# EAGLE board tpms_board (EAGLE 9.6.2)
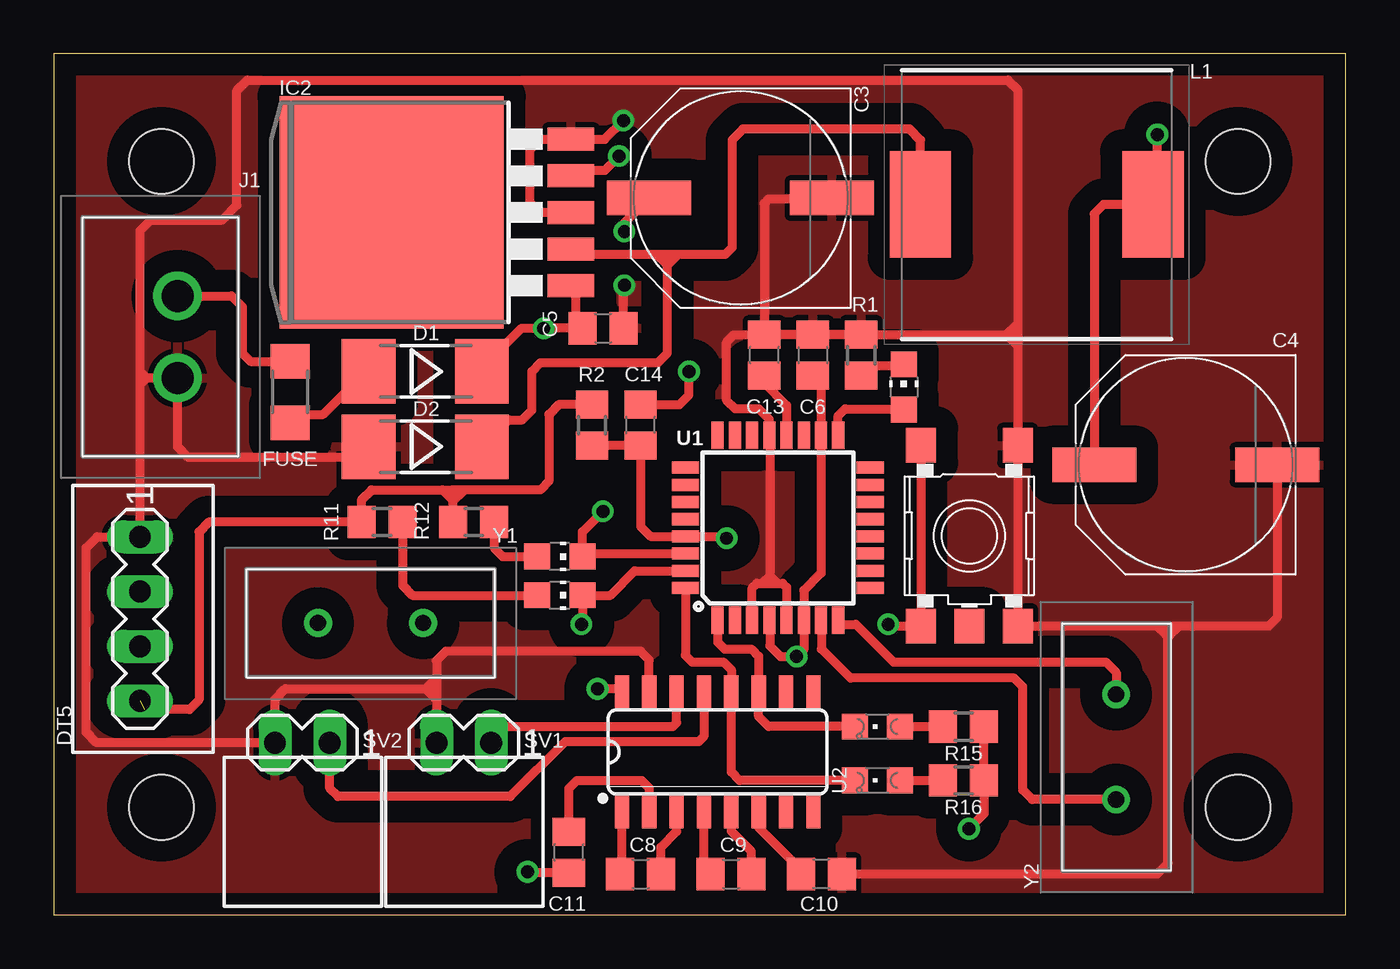
[diagram p0: board, top side]
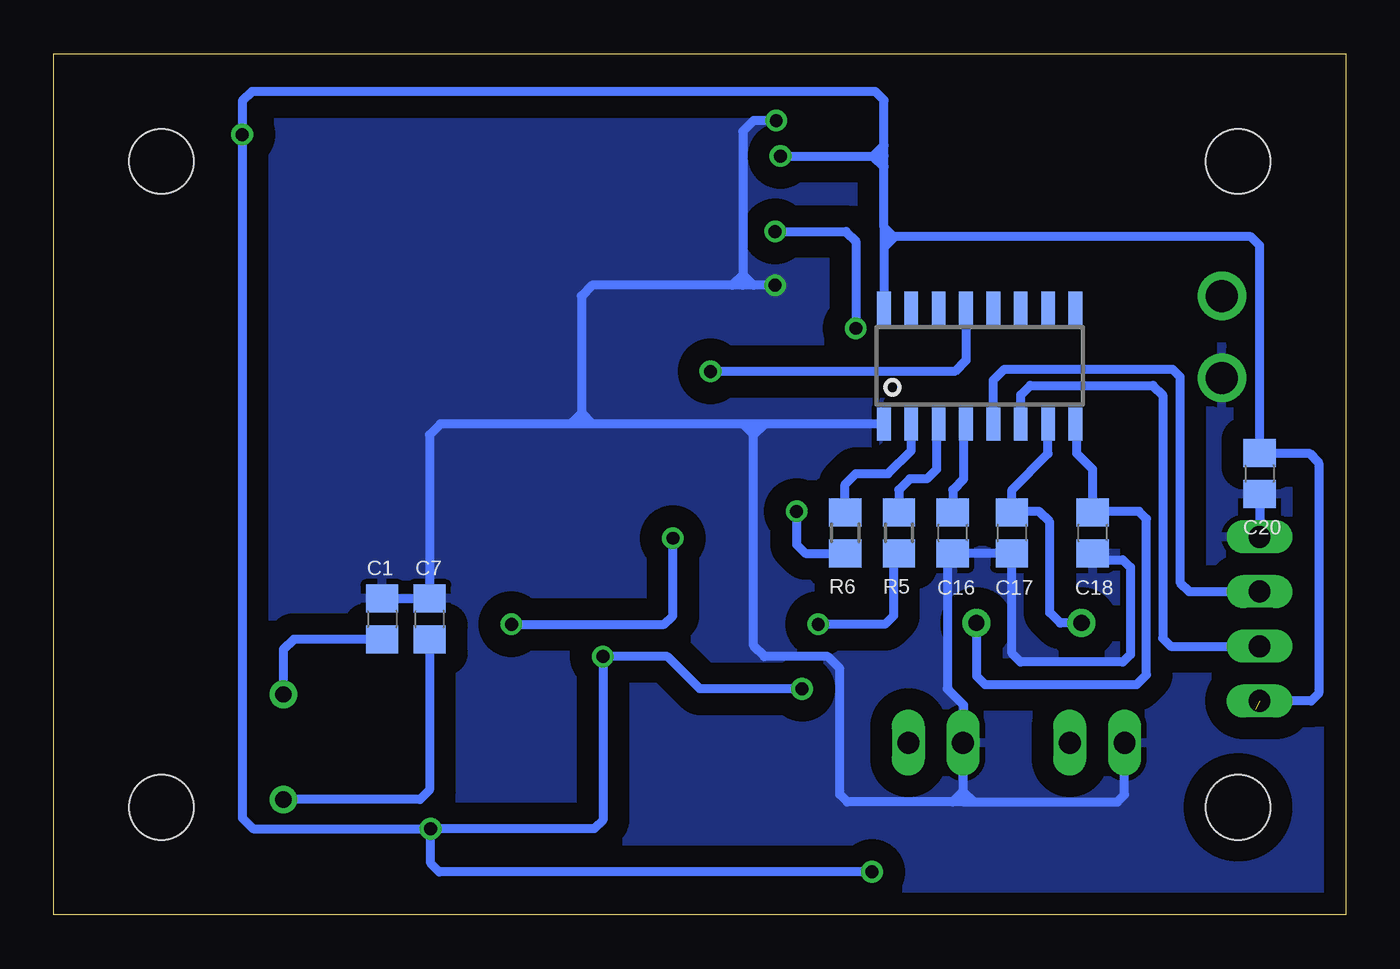
[diagram p1: board, bottom side, seen from below]

Size 60 x 40 mm. Coordinates in mm from the lower left corner, seen from the top.
Outline: 0,0 60,0 60,40 0,40 0,0
Copper layers (1*16): Top 0.035mm / dielectric 1.5mm / Bottom 0.035mm
Design rules "default *": minimum track width 6mil, minimum drill 0.35mm, track to track 40mil, track to pad 40mil, pad to pad 40mil, via to via 40mil, smd to smd 6mil, copper to edge 40mil, drill to drill 6mil, minimum pad ring 10mil, minimum via ring 8mil, stop-mask expansion 4mil, vias tented up to drill 0mil, thermal gap 10mil
Holes 3 mm at 5,35 5,5 55,35 55,5

## Footprints (pad centres in the part's own frame; a part is rotated, then mirrored left to right if it is on the bottom)
C0805 = smd 1.3 x 1.5: 1 -0.95,0; 2 0.95,0
PANASONIC_G = smd 3.9 x 1.6: + 4.25,0; - -4.25,0
MELF-MLL41 = smd 2.5 x 3: A 2.625,0; C -2.625,0
MA04-1 = drill 1.016 long: 1 -3.81,0; 2 -1.27,0; 3 1.27,0; 4 3.81,0
R1206 = smd 1.6 x 1.803: 1 -1.422,0; 2 1.422,0
TO263-5 = smd 1.067 x 2.159: 1 -3.404,-5.791; 2 -1.702,-5.791; 3 0,-5.791; 4 1.702,-5.791; 5 3.404,-5.791 | smd 10.8 x 10.41: 6 0,2.54
691305330002 = drill 1.5 pad 2.25: 1 0,0; 2 3.81,0
INDPM125125X800N = smd 2.85 x 4.95: 1 -5.4,0; 2 5.4,0
CHIPLED_0805 = smd 1.2 x 1.2: A 0,-1.05; C 0,1.05
CHIP-LED0805 = smd 1.2 x 1.2: A 0,-1.05; C 0,1.05
R0805 = smd 1.3 x 1.5: 1 -0.95,0; 2 0.95,0
SKHMPXE010 = smd 1.6 x 1.4: 1 -4.2,2.25; 2 4.2,2.25; 3 -4.2,-2.25; 4 4.2,-2.25; 5 4.2,0
MA04-1' = drill 1.016 long: 1 -3.81,0; 2 -1.27,0
TQFP32-08 = smd 1.27 x 0.559: 1 -4.293,2.8; 2 -4.293,2; 3 -4.293,1.2; 4 -4.293,0.4; 5 -4.293,-0.4; 6 -4.293,-1.2; 7 -4.293,-2; 8 -4.293,-2.8; 17 4.293,-2.8; 18 4.293,-2; 19 4.293,-1.2; 20 4.293,-0.4; 21 4.293,0.4; 22 4.293,1.2; 23 4.293,2; 24 4.293,2.8 | smd 0.559 x 1.27: 9 -2.8,-4.293; 10 -2,-4.293; 11 -1.2,-4.293; 12 -0.4,-4.293; 13 0.4,-4.293; 14 1.2,-4.293; 15 2,-4.293; 16 2.8,-4.293; 25 2.8,4.293; 26 2,4.293; 27 1.2,4.293; 28 0.4,4.293; 29 -0.4,4.293; 30 -1.2,4.293; 31 -2,4.293; 32 -2.8,4.293
SOIC16-1.27-10X3.9MM = smd 0.66 x 1.524: 1 -4.445,-2.794; 2 -3.175,-2.794; 3 -1.905,-2.794; 4 -0.635,-2.794; 5 0.635,-2.794; 6 1.905,-2.794; 7 3.175,-2.794; 8 4.445,-2.794; 9 4.445,2.794; 10 3.175,2.794; 11 1.905,2.794; 12 0.635,2.794; 13 -0.635,2.794; 14 -1.905,2.794; 15 -3.175,2.794; 16 -4.445,2.794
SOIC16 = smd 0.635 x 1.524: 1 -4.445,-2.695; 2 -3.175,-2.695; 3 -1.905,-2.695; 4 -0.635,-2.695; 5 0.635,-2.695; 6 1.905,-2.695; 7 3.175,-2.695; 8 4.445,-2.695; 9 4.445,2.695; 10 3.175,2.695; 11 1.905,2.695; 12 0.635,2.695; 13 -0.635,2.695; 14 -1.905,2.695; 15 -3.175,2.695; 16 -4.445,2.695
9B12000MEEJB = drill 0.755 pad 1.294: 1 0,0; 2 4.88,0

## Placement (x,y rotation side)
C1  22pF  [C0805]  44.75,13.75 270 bottom
C3  100/50v  [PANASONIC_G]  31.9,33.3 180 top
C4  220UF/35V  [PANASONIC_G]  52.57,20.91 180 top
C5  100N  [C0805]  25.5,27.25 0 top
C6  100n  [C0805]  35.25,26 270 top
C7  22pF  [C0805]  42.55,13.75 270 bottom
C8  10UF  [C0805]  27.25,1.9 0 top
C9  10UF  [C0805]  31.45,1.9 0 top
C10  10UF  [C0805]  35.65,1.9 180 top
C11  10UF  [C0805]  23.92,2.9 90 top
C13  100nF  [C0805]  33,26 90 top
C14  100nF  [C0805]  27.25,22.75 90 top
C16  100n  [C0805]  18.25,17.75 90 bottom
C17  22pF  [C0805]  15.5,17.75 90 bottom
C18  22pF  [C0805]  11.75,17.75 90 bottom
C20  1uF  [C0805]  4,20.5 270 bottom
D1  1N5822  [MELF-MLL41]  17.25,25.25 180 top
D2  1N5822  [MELF-MLL41]  17.25,21.75 180 top
DT5  [MA04-1]  4,13.75 270 top
FUSE  2A / 32V  [R1206]  10.98,24.29 270 top
IC2  LM2596S  [TO263-5]  18.23,32.63 90 top
J1  INPUT  [691305330002]  5.75,28.75 270 top
L1  DR127-471-R  [INDPM125125X800N]  45.65,33 0 top
LED10  [CHIPLED_0805]  38.25,6.25 90 top
LED11  [CHIPLED_0805]  38.25,8.75 90 top
ON  [CHIP-LED0805]  39.48,24.53 0 top
R1  330  [R0805]  37.5,26 270 top
R2  10K  [R0805]  25,22.75 90 top
R5  470  [R0805]  20.75,17.75 90 bottom
R6  470  [R0805]  23.25,17.75 90 bottom
R11  1K  [R0805]  15.25,18.25 0 top
R12  1K  [R0805]  19.5,18.25 0 top
R15  1K  [R0805]  42.25,8.75 0 top
R16  1K  [R0805]  42.25,6.25 0 top
RESET1  SKHMPSE010  [SKHMPXE010]  42.52,17.61 270 top
RX  [CHIP-LED0805]  23.5,14.85 270 top
SV1  MA04-1  [MA04-1']  16.5,8 180 top
SV2  MA04-1  [MA04-1']  9,8 180 top
TX  [CHIP-LED0805]  23.5,16.65 270 top
U1  ATMEGA328P_TQFP  [TQFP32-08]  33.63,17.98 90 top
U2  [SOIC16-1.27-10X3.9MM]  30.83,7.57 0 top
U$1  CH340G  [SOIC16]  17,25.5 0 bottom
Y1  9B-12.000MEEJ-B  [9B12000MEEJB]  12.27,13.56 0 top
Y2  9B-12.000MEEJ-B  [9B12000MEEJB]  49.34,5.36 90 top

## Library data of the parts
C1 C7-C11 C14 C16-C18 C20 = rcl; SPICEPREFIX: C
C3 = rcl; E: 100/50v; SPICEPREFIX: C
C4 = rcl; SPICEPREFIX: C; W: 220UF/35V
C5 = resistor; X: 100nF
C6 = rcl; E: 100nF; SPICEPREFIX: C
C13 = rcl; C: 100nF; SPICEPREFIX: C
D1 D2 = diode
DT5 = JST 4 PIN PROGRAM; OC_FARNELL: unknown; OC_NEWARK: unknown
FUSE R2 R5 R6 R11 R12 R15 = rcl; SPICEPREFIX: R
IC2 = national-semiconductor; MF: NATIONAL SEMICONDUCTOR; MPN: LM2596S-ADJ/NOPB; OC_FARNELL: 9494367; OC_NEWARK: 41K3842
J1 = PIN KONEKTOR 2; DESCRIPTION: Pluggable Terminal Blocks WR-TBL Md3053 3.81mm 2Pin Vtcl Hdr; HEIGHT: 9.5mm; MANUFACTURER_NAME: Wurth Elektronik; MANUFACTURER_PART_NUMBER: 691305330002; MOUSER_PART_NUMBER: 710-691305330002; MOUSER_PRICE-STOCK: https://www.mouser.co.uk/ProductDetail/Wurth-Elektronik/691305330002?qs=lBTPRtX1sU%252BM87DWQJO7mQ%3D%3D
L1 = DR127-471-R; ARROW_PART_NUMBER: DR127-471-R; ARROW_PRICE-STOCK: https://www.arrow.com/en/products/dr127-471-r/eaton?region=nac; DESCRIPTION: Eaton Bussmann Series, DR73/74/125/127, 0127 Shielded Wire-wound SMD Inductor with a Ferrite Core, 470 uH +/-20%; HEIGHT: 8mm; MANUFACTURER_NAME: Eaton; MANUFACTURER_PART_NUMBER: DR127-471-R; MOUSER_PART_NUMBER: 704-DR127-471-R; MOUSER_PRICE-STOCK: https://www.mouser.co.uk/ProductDetail/Coiltronics-Eaton/DR127-471-R?qs=yzwxPInThYQRgnstXp0%252BYA%3D%3D
LED10 LED11 ON RX TX = led
R1 = rcl; E: 330; SPICEPREFIX: R
R16 = rcl; R: 1K; SPICEPREFIX: R
RESET1 = switch
SV1 SV2 = JST 2 PIN PROGRAM TIDUR; OC_FARNELL: unknown; OC_NEWARK: unknown
U1 = SparkFun-IC-Microcontroller; PROD_ID: IC-09069
U2 = RS232
U$1 = ch340g
Y1 Y2 = 9B-12.000MEEJ-B; ARROW_PART_NUMBER: 9B-12.000MEEJ-B; ARROW_PRICE-STOCK: https://www.arrow.com/en/products/9b-12.000meej-b/txc-corporation; DESCRIPTION: Crystal 12MHz +/-10ppm (Tol) +/-10ppm (Stability) 18pF FUND 40Ohm 2-Pin DIP HC-49/S Thru-Hole Bulk; HEIGHT: 3.68mm; MANUFACTURER_NAME: TXC; MANUFACTURER_PART_NUMBER: 9B-12.000MEEJ-B; MOUSER_PART_NUMBER: 717-9B-12.000MEEJ-B; MOUSER_PRICE-STOCK: https://www.mouser.co.uk/ProductDetail/TXC-Corporation/9B-12000MEEJ-B?qs=65dIHZNch5vzq4KW6yYwYA%3D%3D

## Nets
+5V: C4.+ C6.2 C11.1 C20.1 DT5.4 IC2.4 L1.2 R2.2 R11.1 R12.1 R15.2 R16.2 U1.4 U1.6 U1.18 U2.16 U$1.16
+24VIN: FUSE.1 J1.1
A: D1.A FUSE.2
D+: DT5.2 U$1.5
D-: DT5.3 U$1.6
DTR: C14.2 U$1.13
GND: C1.1 C3.- C4.- C5.2 C6.1 C7.1 C10.1 C13.2 C16.1 C17.1 C18.1 C20.2 D2.A DT5.1 IC2.3 IC2.5 J1.2 R1.1 RESET1.1 RESET1.2 SV1.2 SV2.2 U1.3 U1.5 U1.21 U2.15 U$1.1
N$1: C9.2 U2.5
N$2: C9.1 U2.4
N$3: ON.A U1.17
N$4: ON.C R1.2
N$5: C13.1 U1.20
N$6: R11.2 RX.A
N$7: R12.2 TX.A
N$8: C16.2 U$1.4
N$10: C17.2 U$1.7 Y1.1
N$11: C18.2 U$1.8 Y1.2
N$13: R5.2 U$1.3
N$14: R6.2 U$1.2
N$16: LED10.A R16.1
N$18: C8.2 U2.3
N$19: C8.1 U2.1
N$21: D2.C IC2.2 L1.1
N$23: LED11.A R15.1
N$24: C10.2 U2.6
N$25: C11.2 U2.2
N$40: C3.+ C5.1 D1.C IC2.1
PB6: C7.2 U1.7 Y2.1
PB7: C1.2 U1.8 Y2.2
RESET: C14.1 R2.1 RESET1.3 RESET1.4 U1.29
RX0: R6.1 TX.C U1.30
RX232-2: LED10.C U1.32 U2.12
RX_RS232-2: SV2.1 U2.13
TX0: R5.1 RX.C U1.31
TX232-2: LED11.C U1.1 U2.11
TX_RS232-2: SV1.1 U2.14

## Tracks (layer width: path | path; a pad name or v marks a point on that pad's centre or on a via)
+5V  (via drill 0.6)  (1 unrouted)
  Top 0.406: C6.2 35.63,25.05 U1.18 35.63,15.88 34.83,15.08 U1.6 34.83,12.33 v34.5,12 33.75,12 33.25,12.5 33.25,13.67 U1.4 | C4.+ 48.32,32.57 48.75,33 L1.2 51.25,33.2 v51.25,36.25 | R15.2 R16.2 43.2,4.7 v42.5,4 | IC2.4 24.27,34.58 25.58,34.58 v26.25,35.25 | 18.05,19.75 14.75,19.75 14.3,19.3 R11.1 7.2,18.25 6.75,17.8 6.75,9.99 6.3,9.54 4.2,9.54 | 18.05,19.75 18.5,19.75 | R2.2 23.45,23.7 23,23.25 23,20.15 22.6,19.75 19,19.75 | 19,19.75 18.5,19.75 | 18.5,19.75 18.55,19.7 18.55,19.25 | R12.1 18.55,19.25 | 18.55,19.25 18.05,19.75 | 18.55,19.25 19,19.7 19,19.75 | C11.1 22.05,1.95 v22,2 | U2.16 26.25,10.5 v25.25,10.5
  Bottom 0.406: DT5.4 1.6,9.94 1.25,10.29 1.25,21 1.7,21.45 C20.1 4,31.1 4.4,31.5 21,31.5 | v26.25,35.25 21.95,35.25 | 21.45,31.95 21.45,31.5 | 21.45,31.5 21.45,31 | 21.45,31 U$1.16 | 21.45,31.5 21,31.5 | 21,31.5 21.45,31.95 | 21,31.5 21,31.45 21.45,31 | 21.45,31.95 21.45,34.75 | 21.45,34.75 21.45,35.25 | 21.45,35.25 21.45,35.75 | 21.45,35.75 21.45,37.84 21.85,38.25 50.8,38.25 51.25,37.8 v51.25,36.25 51.25,4.5 50.75,4 v42.5,4 | 21.45,35.25 21.95,35.25 | 21.95,35.25 21.45,35.75 | 21.95,35.25 21.45,34.75 | v42.5,4 34.9,4 34.5,4.4 v34.5,12 31.5,12 30,10.5 v25.25,10.5 | v42.5,4 42.5,2.4 42.1,2 v22,2
+24VIN
  Top 0.406: 6.5,28.75 J1.1 8.25,28.75 8.75,28.25 8.75,26.1 9.14,25.71 FUSE.1
A
  Top 0.406: FUSE.2 11.36,23.25 12.5,23.25 14.5,25.25 D1.A
D+
  Bottom 0.406: U$1.5 16.36,24.84 15.85,25.35 8.05,25.35 7.7,25 7.7,15.45 7.27,15.02 DT5.2
D-
  Bottom 0.406: U$1.6 15.1,24.16 14.65,24.6 8.95,24.6 8.5,24.15 8.5,12.85 8.13,12.48 DT5.3
DTR  (via drill 0.6)
  Top 0.406: C14.2 29.05,23.7 29.5,24.15 v29.5,25.25
  Bottom 0.406: U$1.13 17.64,25.77 18.15,25.25 v29.5,25.25
GND  (via drill 0.6)
  Top 0.406: IC2.5 23.99,36 | IC2.3 22.57,32.63 22.11,33.09 22.11,35.56 22.58,36.03 IC2.5 | D2.A 14.12,21.25 6.25,21.25 5.75,21.75 J1.2 4.31,24.94 | C10.1 51.25,1.9 51.75,2.4 51.75,13 | C4.- 56.82,13.82 56.41,13.41 52.25,13.41 | 52.25,13.41 51.75,13.41 | 51.75,13.41 51.25,13.41 | 51.25,13.41 RESET1.2 RESET1.1 44.77,26.5 | 51.75,13.41 51.75,13 | 51.75,13 51.66,13 51.25,13.41 | 51.75,13 51.84,13 52.25,13.41 | U2.15 27.66,11.84 27.25,12.25 18.2,12.25 17.77,11.82 17.77,11 | 17.77,11 17.77,10.5 | 17.77,10.5 17.77,10 | 17.77,10 SV1.2 | 17.27,10.5 10.75,10.5 10.27,10.02 SV2.2 2,8 1.5,8.5 1.5,17.05 2.01,17.56 DT5.1 4,24.63 | 17.77,10.5 17.27,10.5 | 17.27,10.5 17.77,11 | 17.27,10.5 17.77,10 | C13.2 C6.1 R1.1 44.25,26.95 | 44.77,27 44.77,26.5 | U1.3 32.43,15.18 32.65,15.4 32.9,15.4 | 32.9,15.4 33.25,15.4 | 33.25,15.4 33.6,15.4 | 33.6,15.4 33.85,15.4 34.03,15.22 U1.5 | 33.25,15.75 33.25,22.25 U1.21 33.23,23.02 32.75,23.5 31.65,23.5 31.25,23.9 31.25,26.6 31.6,26.95 C13.2 | 33.25,15.75 33.25,15.4 | 32.9,15.4 33.25,15.75 | 33.6,15.4 33.25,15.75 | 4,25.25 4,31.78 4.5,32.28 7.82,32.28 8.5,32.96 8.5,38.3 8.98,38.78 44.32,38.78 44.77,38.33 44.77,27.47 | 44.77,27.47 44.77,27 | 44.77,27 44.72,26.95 44.25,26.95 | 44.25,26.95 44.77,27.47 | 44.25,26.95 44.7,26.5 44.77,26.5 | C3.- 36.1,33.25 33.2,33.25 33,33.05 C13.2 | IC2.5 25.58,36.03 v26.45,36.9 | C5.2 26.45,29.2 v26.5,29.25 | 4.31,24.94 4,25.25 | 4,24.63 4,25.25 | 4.31,24.94 4,24.63
  Bottom 0.406: C20.2 DT5.1 | C18.1 11.45,16.5 10.35,16.5 10,16.15 10,12.1 10.35,11.75 15.1,11.75 15.5,12.15 C17.1 C16.1 18.5,16.55 18.5,10.5 17.75,9.75 17.75,8.02 SV1.2 17.77,5.75 | 17.75,5.25 17.27,5.25 | 17.27,5.25 10.6,5.25 10.27,5.58 SV2.2 | C1.1 C7.1 42.55,22.3 42.05,22.8 36,22.8 | U$1.1 27,22.8 | 27,22.8 27.5,22.8 | 27.5,22.8 28,22.8 | 28,22.8 35,22.8 | 35,22.8 35.5,22.8 | 35.5,22.8 36,22.8 | 17.75,5.25 18.25,5.25 | 18.25,5.25 23.15,5.25 23.5,5.6 23.5,11.45 24.05,12 27,12 27.5,12.5 27.5,22.3 | 17.75,5.25 17.77,5.27 17.77,5.75 | 17.77,5.75 17.27,5.25 | 17.77,5.75 18.25,5.27 18.25,5.25 | 26.45,29.3 v26.5,29.25 27.5,29.25 | 27.5,29.25 28,29.25 | 28,29.25 28.5,29.25 | 28.5,29.25 35,29.25 35.5,28.75 35.5,23.3 | 35.5,23.3 35.5,22.8 | 35.5,23.3 35,22.8 | 35.5,23.3 36,22.8 | v26.45,36.9 27.5,36.9 28,36.4 28,29.75 | 28,29.75 28,29.25 | 27.5,29.25 28,29.75 | 28.5,29.25 28,29.75 | 27.5,22.3 27.5,22.8 | 27.5,22.3 27,22.8 | 27.5,22.3 28,22.8
  pour Top: 0,0 60,0 60,40 0,40
  pour Bottom: 0,40 0,0 60,0 60,40
N$1
  Top 0.406: C9.2 32.4,2.95 31.46,3.88 U2.5
N$2
  Top 0.406: C9.1 30.2,1.9 U2.4
N$3
  Top 0.406: U1.17 36.43,23.18 36.75,23.5 39.46,23.5 ON.A
N$4
  Top 0.406: ON.C 39.4,25.5 37.5,25.5 R1.2
N$5
  Top 0.406: C13.1 33,24.7 34.03,23.67 U1.20
N$6
  Top 0.406: 16.25,18.2 R11.2 16.2,15.3 16.65,14.85 RX.A
N$7
  Top 0.406: 20.5,18.2 R12.2 20.45,17.05 20.85,16.65 TX.A
N$8
  Bottom 0.406: U$1.4 17.75,22.69 17.75,20.25 18.25,19.75 C16.2
N$10
  Bottom 0.406: Y1.1 13.26,13.56 13.75,14.05 13.75,18.25 14.25,18.75 15.45,18.75 C17.2 15.5,19.75 13.82,21.43 U$1.7
N$11
  Bottom 0.406: Y1.2 17.15,11.1 16.75,10.7 9.7,10.7 9.25,11.15 9.25,18.4 9.6,18.75 11.7,18.75 C18.2 11.75,20.7 12.51,21.45 12.51,22.76 U$1.8
N$13
  Bottom 0.406: U$1.3 19,22.71 19,20.7 19.45,20.25 20.25,20.25 20.75,19.75 R5.2
N$14
  Bottom 0.406: R6.2 23.25,20 22.75,20.5 21.25,20.5 20.18,21.57 U$1.2
N$16
  Top 0.406: LED10.A R16.1
N$18
  Top 0.406: C8.2 28.2,3.15 28.93,3.88 U2.3
N$19
  Top 0.406: C8.1 26.39,1.98 U2.1
N$21
  Top 0.406: D2.C 21.12,23 21.75,23 22.2,23.45 22.2,25.25 22.6,25.65 28.05,25.65 28.5,26.1 28.5,30.25 | 29,30.68 28,30.68 | 28,30.68 24.27,30.68 IC2.2 | 28.5,30.5 28.5,30.25 | L1.1 40.25,36 39.75,36.5 32,36.5 31.5,36 31.5,31 31.18,30.68 29,30.68 | 28.5,30.25 28.57,30.25 29,30.68 | 28.5,30.25 28.43,30.25 28,30.68
N$23
  Top 0.406: LED11.A R15.1
N$24
  Top 0.406: C10.2 34.5,2.1 34.5,2.3 32.73,4.06 U2.6
N$25
  Top 0.406: C11.2 23.92,5.87 24.3,6.25 27.3,6.25 27.66,5.89 U2.2
N$40  (via drill 0.6)
  Top 0.406: 24.55,29.23 24.25,29.23 | 24.25,29.23 IC2.1 | D1.C 19.88,25.4 21.73,27.25 v22.75,27.25 C5.1 24.25,27.55 24.25,29.23 | C3.+ 26.5,32.15 v26.5,31.75
  Bottom 0.406: v26.5,31.75 23.2,31.75 22.75,31.3 v22.75,27.25
PB6
  Top 0.406: Y2.1 45.44,5.36 45,5.8 45,10.6 44.6,11 37,11 35.65,12.36 35.65,13.67 U1.7
  Bottom 0.406: C7.2 42.55,5.8 42.99,5.36 Y2.1
PB7
  Top 0.406: U1.8 36.62,13.5 37.25,13.5 39,11.75 48.85,11.75 49.34,11.26 Y2.2
  Bottom 0.406: C1.2 48.85,12.8 49.34,12.31 Y2.2
RESET  (via drill 0.6)
  Top 0.406: RESET1.3 RESET1.4 38.84,13.41 v38.75,13.5 | v31.25,17.5 31.17,17.58 U1.29 27.72,17.58 27.25,18.05 C14.1 R2.1
  Bottom 0.406: v38.75,13.5 31.65,13.5 31.25,13.9 v31.25,17.5
RX0  (via drill 0.6)
  Top 0.406: U1.30 24.68,16.78 TX.C 24.55,17.8 v25.5,18.75
  Bottom 0.406: v25.5,18.75 25.5,17.2 25.1,16.8 R6.1
RX232-2
  Top 0.406: LED10.C 31.85,6.25 31.46,6.64 U2.12 31.46,11.39 31.1,11.75 29.65,11.75 29.34,12.06 U1.32
RX_RS232-2
  Top 0.406: U2.13 30.2,8.3 29.95,8.05 23.75,8.05 21.2,5.5 13.2,5.5 12.81,5.89 SV2.1
TX0  (via drill 0.6)
  Top 0.406: v24.5,13.5 24.55,13.55 RX.C 25.85,14.85 26.98,15.98 U1.31
  Bottom 0.406: R5.1 21,16.55 21,13.9 21.4,13.5 v24.5,13.5
TX232-2
  Top 0.406: LED11.C 33.2,8.75 32.73,9.21 U2.11 32.73,12.02 32.4,12.35 31.15,12.35 30.83,12.67 U1.1
TX_RS232-2
  Top 0.406: SV1.1 20.31,8.25 20.81,8.75 28.75,8.75 28.93,8.93 U2.14